# Altium PCB DC-UPS-v1.0.PcbDoc (part 8 of 8)
Units mil, origin at the board's own origin, x right, y up, seen from the top; angles counter-clockwise.
Board outline 5905.51 x 3937.01 mil, 4 copper layers (Top Layer, SIG+PWR, SIG+GND, Bottom Layer), stack 62.449 mil thick; 278 components, 138 nets, 716 pads, 780 vias.
Unrouted connection lines stored in the file: 13.
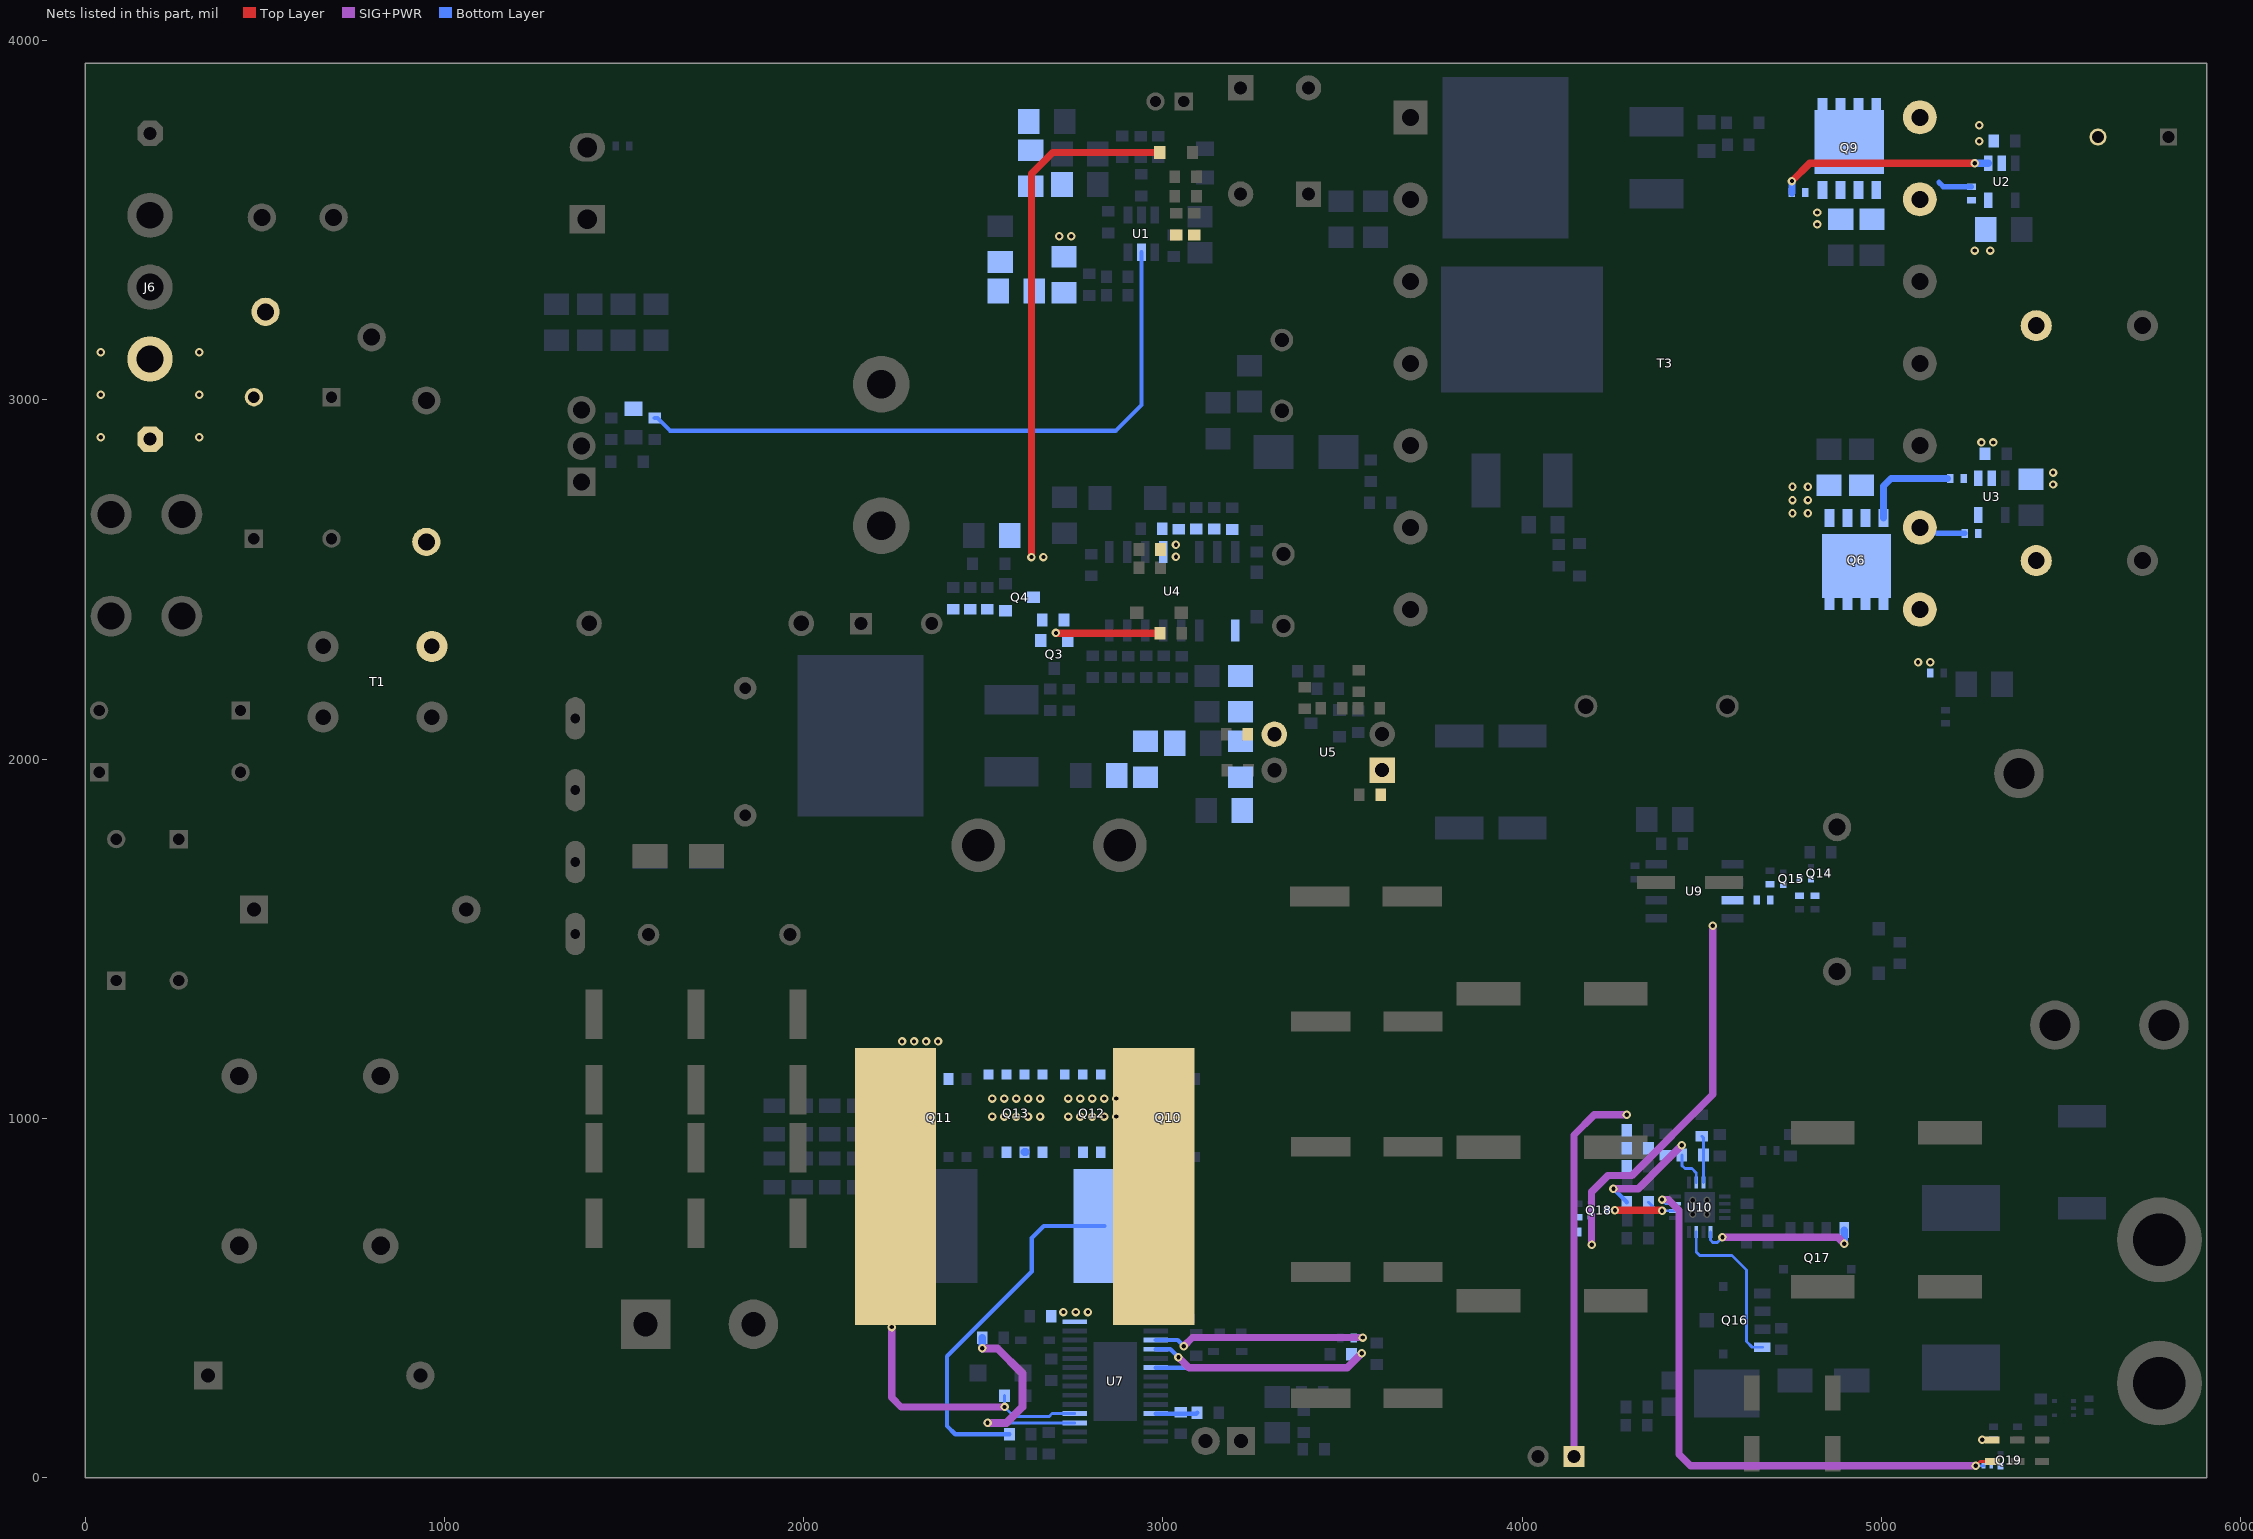
[diagram p5: the nets of this part, all layers, seen from the top]

## Via types
v1: diameter 23.62, hole 11.81, Top Layer to Bottom Layer, 767 vias
v2: diameter 19.69, hole 11.81, Top Layer to Bottom Layer, 12 vias
v3: diameter 23.62, hole 11.81, Top Layer to Bottom Layer, tented both sides, 1 vias

## Nets (pads, with @x,y where several pads share a name; then routed paths per layer and width w, separated by ;. In a path a pad name is that pad's centre, name@x,y a point inside that pad or via, vN(x,y) a via of type N, cw(c..) or ccw(c..) an arc to the next point about the centre after c; other vN are vias at no path point) (continued)
NetLED3_1: LED3.1 R97.1 | length 30.8
  Bottom Layer w8: v1@5280.18,105.28 R97.1@5311,105.28
  other v1: 5280.18,105.74
NetLED3_2: LED3.2 R96.2 U10.3 | length 1691.2
  Top Layer w8: v1(5262,33) 5274.22,45.22 LED3.2@5308,45.22
  SIG+PWR w20: v1(4389,774) 4406.28,774 4435.95,744.33 4435.95,65.05 4468,33 v1(5262,33)
  Bottom Layer w8: v1(4389,774) 4400.66,762.34 U10.3@4425.1,762.34 ; v1(5262,33) R96.2@5283.35,33
NetQ3_1: Q3.1 Q4.3 R17.1
NetQ4_1: Q4.1 R18.1 R21.2 R22.2
NetQ6_4: Q6.4 R38.1 | length 275.4
  Bottom Layer w20: Q6.4@5005,2670.84 5005,2760 5026,2781 R38.1@5182.5,2781
NetQ6_5: Q6.5 Q6.6 Q6.7 Q6.8 R35.1 T3.8 T3.9 | length 133.1
  Bottom Layer w15: T3.9@5106.32,2644.27 5122.59,2628 5123.65,2629.06 5153.8,2629.06 5154.85,2628 R35.1@5231.84,2628
NetQ9_4: Q9.4 R37.1
NetQ9_5: Q9.5 Q9.6 Q9.7 Q9.8 R34.1 T3.13 T3.14 | length 95.4
  Bottom Layer w15: 5159.67,3604.9 5171.93,3592.64 R34.1@5250,3592.64
NetQ14_1: Q14.1 Q15.3 R75.1 R76.2
NetQ15_1: Q15.1 R77.1 R78.2
NetQ16_4: Q16.4 U10.15 | length 465.9
  Bottom Layer w8: U10.15@4484.16,683.6 4484.16,627.84 4494,618 4584,618 4624,578 4624,379 4640,363 Q16.4@4668,363
NetQ17_4: Q17.4 U10.13 | length 450.1
  SIG+PWR w20: v1(4557,669) 4877.86,669 v1(4896.06,650.8)
  Bottom Layer w8: U10.13@4523.53,683.6 4523.53,661.47 4531,654 4542,654 v1(4557,669)
  Bottom Layer w20: v1(4896.06,650.8) Q17.4@4896.06,689.37
NetQ18_1: Q18.1 R87.1 R88.2
NetQ18_3: Q18.3 R83.1 U10.2 | length 242.1
  Top Layer w20: v1(4257.8,744.33) 4389,744.33 v1(4389,742.65)
  SIG+PWR w8: v1@4387.32,744.33 v1(4389,742.65)
  Bottom Layer w8: Q18.3@4235,744.33 v1(4257.8,744.33) ; R83.1@4351,766.58 4374.93,742.65 v1(4389,742.65) U10.2@4425.1,742.65
NetQ19_1: Q19.1 R96.1
NetR1_1: R1.1 R3.2
NetR2_1: R2.1 R5.1 U1.5 | length 1823.6
  Bottom Layer w12: R5.1@1586,2949 1593,2949 1628,2914 2869,2914 2940,2985 U1.5@2940,3410.68
NetR3_1: R3.1 R7.2
NetR4_1: R4.1 R8.2
NetR8_1: R8.1 R11.2
NetR11_1: R11.1 R19.2 R20.2
  other v1: 2711.67,3455 2745,3455
NetR34_2: R34.2 U2.5
NetR35_2: R35.2 U3.5
NetR37_2: R37.2 U2.1 | length 599.8
  Top Layer w20: v1(4750.5,3608.62) 4799.88,3658 v1(5259,3658)
  Bottom Layer w20: R37.2@4750.5,3576 v1(4750.5,3608.62) ; v1(5259,3658) U2.1@5297.2,3658
NetR38_2: R38.2 U3.1
NetR39_1: R39.1 R41.2
NetR41_1: R41.1 R45.2
NetR42_2: R42.2 R43.1
NetR43_2: R43.2 R44.1
NetR44_2: R44.2 U4.1
NetR53_1: R53.1 U5.1
NetR57_2: R57.2 U5.3
NetR60_1: R60.1 R67.2 U7.11 | length 116.2
  Bottom Layer w12: U7.11@2980,178.19 3092.19,178.19 R67.2@3095,181
NetR61_1: R61.1 U7.3 | length 592.9
  SIG+PWR w20: v1(3058,366) 3082,390 v1(3556,390)
  Bottom Layer w12: U7.3@2980,382.92 3041.08,382.92 v1(3058,366)
NetR69_1: R69.1 U7.17 | length 620.7
  SIG+PWR w22: v1(2497,360) 2539,360 2609,290 2609,197 2564.6,152.6 v1(2512,152.6)
  Bottom Layer w8: v1(2512,152.6) U7.17@2754.35,152.6
  Bottom Layer w22: v1(2497,360) R69.1@2497,389
NetR70_2: R70.2 U7.4 | length 610.8
  SIG+PWR w20: v1(3043,335) 3072,306 3513,306 v1(3553,346)
  Bottom Layer w12: U7.4@2980,357.33 3020.67,357.33 v1(3043,335)
NetR72_2: R72.2 U7.6 | length 454.2
  Bottom Layer w12: U7.6@2980,306.15 R72.2@3434.17,306.15
NetR77_2: R77.2 R87.2 U9.3 | length 1101.1
  SIG+PWR w20: v1(4193,648.33) 4193,795.5 4238,840.5 4304.5,840.5 4530,1066 v1(4530,1536)
  Bottom Layer w8: v1@4192.36,648.97 R87.2@4192.36,683.83
NetR82_1: R82.1 R85.2 U10.7 | length 130.2
  Bottom Layer w8: R85.2@4500,950 4503.84,946.16 U10.7@4503.84,821.39
NTRL: C1.2 C4.2 J1.1 J6.3 T1.1 VR1.2
  other v1: 44,2895.67 318,2895.67 44,3013.83 318,3013.83 44,3132 318,3132
RCS: Q12.1 Q12.2 Q12.3 Q13.1 Q13.2 Q13.3 R68.2 R73.1 | length 1023.1
  Bottom Layer w12: R73.1@2573,121 2422,121 2399,144 2399,338 2635,574 2635,667 2668.25,700.25 R68.2@2837,700.25
  Bottom Layer w22: Q13.2@2614.91,906.01 Q13.2@2618,906.01
RVCC: C17.2 C48.2 C49.2 C50.2 C51.2 D7.2 Q3.2 R17.2 R36.2 R40.1 R46.2 U4.12 | length 1739.3
  Top Layer w20: v1(2634,2562) 2634,3629 2693,3688 D7.2@2991.45,3688 ; v1(2702,2351) 2703,2350 R36.2@2991.98,2350
  other v1: 2667.33,2562 3036,2562.67 3036,2596
SGND: C26.2 C27.2 C31.2 C32.2 C33.2 C35.2 C36.2 C40.1 C41.1 C42.1 C43.1 NT2.1 Q6.1 Q6.2 Q6.3 Q9.1 Q9.2 Q9.3 U2.2 U3.2
  other v1: 5101.32,2269.22 5135.47,2269.22 4752,2683.83 4795,2683.67 4752,2720.83 4795,2720.83 4752,2758 4795,2758 5477,2764 5477,2797.33 5277.67,2881 5311,2881 5259,3415 5302,3415 4821,3487.67 4821,3521 5272,3719 5272,3763.9
SW1: C76.1 L3.1 Q10.1 Q10.2 Q10.3 Q12.5 Q12.6 Q12.7 Q12.8 U7.28
  other v1: 2723,461 2757,461 2791,461 2736.67,1005 2770,1005 2803.33,1005 2836.67,1005 2870,1005 2736.67,1055 2770,1055 2803.33,1055 2836.67,1055 2870,1055
SW2: C86.1 L3.2 Q11.1 Q11.2 Q11.3 Q13.5 Q13.6 Q13.7 Q13.8 U7.18 | length 761.5
  SIG+PWR w20: v1(2245,419) 2245,223 2271,197 v1(2559,197)
  Bottom Layer w8: C86.1@2559,228.25 v1(2559,197) 2585.42,170.58 2683.68,170.58 2691.29,178.19 U7.18@2754.35,178.19
  other v1: 2524.67,1005 2558,1005 2591.33,1005 2624.67,1005 2658,1005 2524.67,1055 2558,1055 2591.33,1055 2624.67,1055 2658,1055 2274,1214 2307.33,1214 2340.67,1214 2374,1214
TS: J4.1 R92.1 R93.1 R94.2 | length 1065.2
  SIG+PWR w20: J4.1@4144,59 4144,954 4200,1010 v1(4291,1010)
VRFEF_BQ: C99.2 R82.2 R83.2 R92.2 U10.6 | length 397.8
  SIG+PWR w20: v1(4253.58,804) 4323,804 v1(4444,925)
  Bottom Layer w8: R82.2@4444,898 4444,869 4453,860 4472,860 4484.16,847.84 U10.6@4484.16,821.39
  Bottom Layer w12: v1(4253.58,804) R83.2@4291,766.58
pads on no net: J6.2 T3.1 T3.3 T3.7 U9.5 U9.7 U10.5 U11.3

## Polygon pours and split planes (outlines as drawn)
12V# on Top Layer "12V#_L01_P024" (solid, remove dead copper, pour order 24): 4300,2100.77 5900,2100.77 5900,3923 4300,3923
BUCK-BOOST-IN on Top Layer "BUCK-BOOST-IN_L01_P045" (solid, remove dead copper, pour order 45): 4121.48,0 4121.48,990 4121.48,1466.08 5894,1466.08 5894,2060 3696.14,2060 3696.14,1827.82 3180,1827.82 3180,0
DC-GND on Top Layer "DC-GND_L01_P052" (solid, remove dead copper, pour order 52): 4225,2083 4123,2083 4123,2151.05 4123,2155.23 4123,2321 3514,2321 3514,2229.08 3357.27,2229.08 3357.27,2134.14 3198,2134.14 3198,1917 2342,1917 2342,1430 1269,1430 1269,3923 4225,3923
BAT on Top Layer "BAT_L01_P057" (solid, remove dead copper, pour order 57): 5895,1433 4152,1433 4152,0 4938,0 5895,0
LV on Top Layer "LV_L01_P004" (solid, remove dead copper, pour order 4): 10,3925 10,3422 577,3422 577,3925
GND on Top Layer "GND_L01_P001" (solid, remove dead copper, pour order 1): 4937,1031 4937,484 4686,484 4686,1073 4944,1073
GND on Top Layer "GND_L01_P054" (solid, remove dead copper, pour order 54): 2788,169 2788,159 3079.42,159 3079.42,0 3168,0 3168,541 2788,541
12V-OUT on Top Layer "12V-OUT_L01_P003" (solid, pour order 3): 2120.03,0 2124,0 3066.44,0 3066.44,347 2115,347 2115,1162 1269,1162 1269,0 2115,0
NetC4_1 on Top Layer "NETC4_1_L01_P005" (solid, remove dead copper, pour order 5): 1159,2392 733,2392 733,2242 426,2242 426,2503 1020,2503 1020,2868 614,2868 614,3924 1159,3924
EARTH on Top Layer "EARTH_L01_P006" (solid, remove dead copper, pour order 6): 762,2543.6 350,2543.6 350,1697 10,1697 10,2797 762,2797
NetC5_1 on Top Layer "NETC5_1_L01_P016" (solid, remove dead copper, pour order 16): 382,2215 736,2215 736,2054 382,2054 382,2217
NetC2_2 on Top Layer "NETC2_2_L01_P017" (solid, remove dead copper, pour order 17): 384,2042 384,1881 745,1881 745,1005 1164,1005 1164,2217 777,2217 777,2042
NetC5_1 on Top Layer "NETC5_1_L01_P019" (solid, remove dead copper, pour order 19): 378,1217.47 329,1217.47 329,1001 620,1001 620,1800 378,1800
NetC6_1 on Top Layer "NETC6_1_L01_P034" (solid, remove dead copper, pour order 34): 8,5 613,5 613,933 202,933 202,1497 8,1497
NetC44_1 on Top Layer "NETC44_1_L01_P051" (solid, remove dead copper, pour order 51): 3062,2556 3181,2556 3181,2504 3250,2504 3250,2954 3761,2954 3761,3236 2663,3236 2663,2629 3062,2629
SGND on Bottom Layer "SGND_L04_P063" (solid, remove dead copper, pour order 63): 4571,3541 4571,2990 4312,2990 4312,2047 4759.5,2047 4759.5,2648.5 4759.5,3541
GND on Bottom Layer "GND_L04_P050" (solid, remove dead copper, pour order 50): 3215.24,1373 3215.24,1774 3551,1774 3551,1376 3575,1373 5069.85,1373 5069.85,387 5900.51,387 5900.51,0 1269,0 1269,1373
NetC15_1 on Bottom Layer "NETC15_1_L04_P012" (solid, remove dead copper, pour order 12): 1265,2934 1491,2934 1491,3108 1737,3108 1737,3215.25 1265,3215.25
DC-GND on Bottom Layer "DC-GND_L04_P056" (solid, remove dead copper, pour order 56): 3679,2130 3679,2253 4134,2253 4134,2043 4252,2043 4252,3922 1268,3922 1268,1430 2075,1430 2075,2130
NetC3_2 on Bottom Layer "NETC3_2_L04_P011" (solid, remove dead copper, pour order 11): 624,1484 624,1987 930,1987 930,1245 329,1245 329,968 1161,968 1161,8 712,8 712,733 154,733 154,1484
SGND on Bottom Layer "NONET_L-01_P-001" (solid, remove dead copper, pour order 60): 4616,2047 4974,2047 4974,2157.5 5155.5,2157.5 5155.5,2330 4616,2330
12V on Bottom Layer "12V_L04_P009" (solid, remove dead copper, pour order 9): 3706,2010 5270.24,2010 5270.24,1861 5600,1861 5600,1110 4675,1110 3706,1110
BAT on Bottom Layer "BAT_L04_P007" (solid, remove dead copper, pour order 7): 5905.51,415.84 5505,415.84 5505,193.69 5410.31,193.69 5410.31,638 5632,638 5632,880 4678,880 4678,970 5052.5,970 5052.5,1089 5632,1089 5632,1863 5905.51,1863
12V# on Bottom Layer "12V#_L04_P026" (solid, remove dead copper, pour order 26): 5352,3357 5352,3580 5460,3580 5460,3929 5897,3929 5897,2125 5305,2125 5305,2730 5541,2730 5541,2945 5235,2945 5235,2814 5076,2814 4785,2814 4785,3448 5222,3448 5222,3357
LV on Bottom Layer "LV_L04_P059" (solid, remove dead copper, pour order 59): 10,3926 10,3422 577,3422 577,3926
BUCK-BOOST-IN on Bottom Layer "BUCK-BOOST-IN_L04_P002" (solid, remove dead copper, pour order 2): 4033,724 4033,253 3593.45,253 3593.45,724 2925.32,724 2925.32,1040 2924.23,1060.72 3204,1060.72 3204,1774 3692,1774 3692,1101 4039,1101 4039,724
NetC12_1 on Bottom Layer "NETC12_1_L04_P014" (solid, remove dead copper, pour order 14): 4223,3923 4223,3406 3775,3406 3775,3683.07 3310,3683.07 3310,3923
NTRL on Bottom Layer "NTRL_L04_P055" (solid, remove dead copper, pour order 55): 3,3213 3,2775.71 775,2775.71 775,2245 1165,2245 1165,2922 597,2922 597,3316 305,3316 305,3213
RCS on Bottom Layer "RCS_L04_P047" (solid, remove dead copper, pour order 47): 2550,923 2550,889 2700,889 2700,926 2751,926 2751,536 2922,536 2922,944 2548,944
NetC55_2 on Bottom Layer "NETC55_2_L04_P042" (solid, remove dead copper, pour order 42): 2786,2389 2832,2389 2862,2389 2862,2328 2825,2328 2825,2268 2786,2268
NetC30_1 on Bottom Layer "NETC30_1_L04_P039" (solid, remove dead copper, pour order 39): 2836,2321 2882,2321 2882,2466 2912,2466 2912,2309 2875,2309 2875,2268 2836,2268
NetC12_2 on Bottom Layer "NETC12_2_L04_P027" (solid, remove dead copper, pour order 27): 2212,2443 2212,2290 1908,2290 1908,1635 2679,1635 2679,1897 2388,1897 2388,2443
NetQ9_5 on Bottom Layer "NETQ9_5_L04_P025" (solid, remove dead copper, pour order 25): 5222,3469 5222,3864 4806,3864 4806,3628 5036,3628 5036,3469
NetC44_1 on Bottom Layer "NETC44_1_L04_P015" (solid, remove dead copper, pour order 15): 4541,3013 3623,3013 3623,3379 4267,3379 4267,3712 4541,3712
NetD5_2 on Bottom Layer "NETD5_2_L04_P013" (solid, remove dead copper, pour order 13): 1553,2915 1553,2855 1491,2855 1491,2674 1303,2674 1303,2810.62 1442,2810.62 1442,2915
12V# on SIG+PWR "12V#_L02_P062" (solid, remove dead copper, pour order 62): 4268,3305 3782,3305 3782,2327.76 3690.99,2236.75 3690.99,2109.01 3710,2090 5900,2090 5900,3923 4268,3923
BUCK-BOOST-IN on SIG+PWR "BUCK-BOOST-IN_L02_P041" (solid, remove dead copper, pour order 41): 5898,2071 5898,1618 4312.98,1618 4312.98,0 3208,0 3208,2071 5894,2071
NetC13_2 on SIG+PWR "NETC13_2_L02_P022" (solid, remove dead copper, pour order 22): 1273,3608 1474,3608 1474,2919 1307,2919 1307,2821 1631,2821 1631,3731 2795,3731 2795,3917 1273,3917
NetC12_1 on SIG+PWR "NETC12_1_L02_P028" (solid, remove dead copper, pour order 28): 3124.5,1623 3124.5,3431 3557,3431 3557,3641 3775,3641 3775,3379 4207,3379 4207,3923 3306,3923 3306,3815 3106,3615 2876.5,3615 2447,3615 2447,3450 2445,3450 2445,1904 2753,1904 2753,1623
NetC55_2 on SIG+PWR "NETC55_2_L02_P010" (solid, remove dead copper, pour order 10): 2770,2306 3614,2306 3614,2800 3468,2800 3468,2396 2770,2396
BAT on SIG+PWR "BAT_L02_P040" (solid, remove dead copper, pour order 40): 5640,1588 5640,1127 4891,1127 4891,9 5897,9 5897,1588
12V on SIG+PWR "12V_L02_P046" (solid, remove dead copper, pour order 46): 4854,1171 4854,0 4361,0 4361,1588 5620,1588 5620,1171
LV on SIG+PWR "LV_L02_P049" (solid, remove dead copper, pour order 49): 8,3927 8,3422 577,3422 577,3927
12V-OUT on SIG+PWR "12V-OUT_L02_P030" (solid, remove dead copper, pour order 30): 1268,10 3172,10 3172,1358 1268,1358
NTRL on SIG+PWR "NTRL_L02_P031" (solid, remove dead copper, pour order 31): 3,3213 3,2775.71 867,2775.71 867,2246 1163,2246 1163,2936 597,2936 597,3316 305,3316 305,3213
NetC5_1 on SIG+PWR "NETC5_1_L02_P032" (solid, remove dead copper, pour order 32): 592,1525 381,1525 381,1900 482,1900 482,2050 381,2050 381,2217 592,2217
NetC6_1 on SIG+PWR "NETC6_1_L02_P033" (solid, remove dead copper, pour order 33): 1413,1815 631,1815 631,1498 5,1498 5,1287 166,1287 166,1433 983,1433 983,1633 1415.41,1633
NetC8_2 on SIG+PWR "NETC8_2_L02_P035" (solid, remove dead copper, pour order 35): 2336,1431 2336,2792 1687,2792 1687,1431
NetC15_1 on SIG+PWR "NETC15_1_L02_P036" (solid, remove dead copper, pour order 36): 3095,3780 3095,3627 1790,3627 1790,3098 1647,3098 1647,3717 2945,3717 2945,3780
SGND on SIG+GND "SGND_L03_P029" (solid, remove dead copper, pour order 29): 5905.51,3931 5905.51,2218 4314,2218 4314,3931 5676,3931
GND on SIG+GND "GND_L03_P044" (solid, remove dead copper, pour order 44): 4305,1815 3317,1815 3317,1364 1270,1364 1270,0 5900.51,0 5900.51,2148 4305,2148
DC-GND on SIG+GND "DC-GND_L03_P037" (solid, remove dead copper, pour order 37): 3249,1430 3249,1929 4216,1929 4216,3923 1269,3923 1269,1430
EARTH on SIG+GND "EARTH_L03_P048" (solid, remove dead copper, pour order 48): 762,2543.6 350,2543.6 350,1697 10,1697 10,2797 762,2797
NetC6_1 on SIG+GND "NETC6_1_L03_P061" (solid, remove dead copper, pour order 61): 8,5 613,5 613,933 202,933 202,1497 8,1497
RVCC on SIG+GND "RVCC_L03_P023" (solid, remove dead copper, pour order 23): 2744,2542 3052,2542 3052,2630 2606,2630 2606,2342 2744,2342

## Other copper
Top Layer:
  rectangle net 12V: 4288,1854 4382,1915
  rectangle net 12V: 5397.8,1128 5601.4,1191.57
  rectangle net 12V: 3701,1692 4135,1767
  rectangle net GND: 4530,10 4967.46,120
  rectangle net GND: 5650,10.2 5893,400.95
  rectangle net NetC94_1: 4461,297 4674,317
  rectangle net NetC94_1: 4461,161 4888,301
  rectangle net GND: 4161,1280 4360,1410
  rectangle net GND: 4161,856 4360,986
  rectangle net GND: 4161,432 4360,562
  rectangle net GND: 3349.75,1552 3523.75,1682
  rectangle net GND: 3352,1203.67 3526,1333.67
  rectangle net GND: 3352,855.33 3526,985.33
  rectangle net GND: 3352,507 3526,637
  region net GND: 3559.02,153.33 3559.02,293.33 3355.97,293.33 3355.97,153.33
  rectangle net GND: 1355,638.87 1482,776.66
  rectangle net GND: 1638.5,638.87 1765.5,776.66
  rectangle net GND: 1922,638.87 2049,776.66
  rectangle net GND: 1269,1213 2115,1367
  rectangle net NetC37_1: 5165.5,2138 5265,2281
  rectangle net NetC93_1: 4448,1635 4619.15,1679
  rectangle net NetC20_1: 3030,3800 3146,3860
  rectangle net NetD2_1: 1680,1696.79 1806.2,1763.72
  rectangle net GND: 4253.03,1635 4430.03,1679
  rectangle net BUCK-BOOST-IN: 3117,322 3217,458
  rectangle net DC-GND: 3050,2104 3198,2164
  rectangle net DC-GND: 3162,1949 3198,2164
  rectangle net NetC34_2: 2853,2510 2950,2602
  rectangle net RVCC: 2978,2560 3046,2610
  rectangle net NetD11_2: 3030,2329 3101,2439
  rectangle net NetR53_1: 3574,1877 3671,2005
  rectangle net NetC58_2: 3215,1917 3354,2012.5
  rectangle net NetR57_2: 3215,2026 3356,2127
  rectangle net NetC52_2: 3483,2121 3518,2220
  rectangle net NetC52_2: 3371,2185 3518,2220
  rectangle net NetC52_1: 3371,2119 3472,2164
  rectangle net NetC52_2: 3483,1877 3562.5,2202
  rectangle net NetC57_1: 3574,2028 3671,2173
  rectangle net NetR11_1: 2685,3441 3105,3474
  rectangle net NetC23_2: 2789,3484 3050,3640
  rectangle net NetC23_2: 2789,3484 3107,3534
  rectangle net NetC20_1: 3057,3660 3146,3860
  rectangle net SW2: 2142.56,389 2385,1239
  rectangle net SW1: 2710,390 3100,1240
  region net NetLED2_2: 5417.32,58.94 5355.32,58.94 5355.32,32.94 5417.32,32.94
  rectangle net NetLED1_1: 5406.64,92 5468.64,118
  rectangle net NetLED2_1: 5337.32,92 5399.32,118
  rectangle net NetLED3_1: 5268,92 5330,118
  rectangle net 12V#: 3698.5,2102 4115,2309
  rectangle net 12V#: 3527.5,2225 4114,2309
  rectangle net NetC12_1: 1274.86,3408 2591,3594
  pour cut-out: 5390,1256.22 ccw(c5483.78,1264.9) 5556.23,1204.72 ccw(c5482.1,1259.46)
  pour cut-out: 4813.4,1407.84 ccw(c4876.43,1407.84) 4876.43,1344.81 ccw(c4876.43,1407.84) 4939.46,1407.84 ccw(c4876.43,1407.84) 4876.43,1470.88 ccw(c4876.43,1407.84)
  pour cut-out: 4813.4,1809.43 ccw(c4876.43,1809.43) 4876.43,1746.4 ccw(c4876.43,1809.43) 4939.46,1809.43 ccw(c4876.43,1809.43) 4876.43,1872.46 ccw(c4876.43,1809.43)
  pour cut-out: 4240,1700 4240,1620 4630,1620 4630,1700 4245.9,1700
  pour cut-out: 1681,1619 1840,1619 1840,1830 1681,1830 1681,1667.86
  pour cut-out: 1282,2046 1282,1619 1681,1619 1681,2046
SIG+PWR:
  rectangle net NetC13_2: 1307,2831 1441,2919
  rectangle net SW1: 2720.33,955 2910.33,1075
  rectangle net SW2: 2500,955 2690,1075
  rectangle net 12V-OUT: 2390,900 2475,1065
  pour cut-out: 2906.86,2459.38 2941.86,2459.38 2941.86,2432.26 2906.86,2432.26
Bottom Layer:
  rectangle net NetC98_1: 4645.55,399.22 5063,544.01
  rectangle net NetR11_1: 2686,3367 2763,3473
  rectangle net NetC38_1: 2364.19,2462 2433.5,2495.11
  region net NetR77_2: 4514.22,1621.96 4514.22,1518 4544.22,1518 4544.22,1621.96
  rectangle net NetC37_1: 5165,2127 5265,2330
  rectangle net SGND: 5084,2226.5 5145.19,2281
  rectangle net NetQ6_5: 4793,2350 5200,2625.97
  rectangle net SGND: 5084,2226.5 5145.19,2281
  region net NetD2_1: 1880,1784 1802,1784 1802,1402 1880,1402
  region net NetD2_1: 3151,1402 3151,1471 1821,1471 1821,1402
  rectangle net NetD2_1: 3073,1425 3151,1896
  region net NetD2_1: 1880,1672 1880,1783.99 1680.53,1783.99 1680.53,1672
  rectangle net NetC3_2: 1502,1672 1629,1904
  region net SGND: 5499,2885.72 5499,2923.88 5257.03,2923.88 5257.03,2885.72
  rectangle net 12V#: 3690,2032.46 4112.95,2226
  rectangle net NetC98_1: 4706.99,506.98 4919.01,627.06
  rectangle net GND: 4669,637.5 4723.43,697.5
  rectangle net GND: 4669,664.22 4855,746
  rectangle net NetC94_1: 4621,154 4883,195
  rectangle net 12V: 5166,99 5228,151.28
  rectangle net 12V: 4334,171.54 4398.54,214.25
  rectangle net 12V: 4387.9,109 4439.08,295.95
  rectangle net 12V: 5166,128 5390.5,151.28
  rectangle net GND: 2198.22,756.5 2263.83,860.86
  rectangle net GND: 4990,2090 5150.19,2146.78
  rectangle net BAT: 4698.5,878.5 4838,923.5
  rectangle net 12V#: 3690,2032.46 4110.2,2105
  rectangle net NetC98_2: 4702.99,237.32 4808.21,376.78
  rectangle net NetC103_2: 5079,670 5344,818
  rectangle net GND: 4416.7,1746.5 4520,1865
  rectangle net GND: 4490,1687.91 4827.14,1757.5
  rectangle net NetC20_1: 3032.41,3792.35 3147,3861
  rectangle net 12V: 4145,1692 4376.7,1875
  rectangle net GND: 4673,1672.82 4735.22,1722.5
  rectangle net GND: 4990,2051 5365,2105
  rectangle net NetC30_1: 3460.76,3383 3530.76,3482.25
  rectangle net NetC55_2: 3512,2694 3596,2790
  rectangle net NetR34_2: 5285.39,3527 5309.01,3577.29
  region net NetR34_2: 5309.01,3527 5309.01,3564.64 5237.5,3564.64 5237.5,3527
  rectangle net NetQ9_5: 5084.23,3713.38 5128.42,3852
  rectangle net NetQ9_5: 5084.23,3486 5128.42,3634
  rectangle net SGND: 5241,3384.55 5325,3508.36
  rectangle net SGND: 5250,3702.5 5349,3786
  rectangle net NetC12_2: 2357,1722 2621,1800.17
  rectangle net NetC12_2: 2212,2290 2388,2443
  rectangle net NetD2_1: 1680.53,1693.79 1805.5,1760.72
  rectangle net NetC3_2: 758,1836 1629,1987
  rectangle net NetC98_1: 5017,243.02 5383,435
  rectangle net GND: 3450,295 3480,360
  rectangle net 12V: 4387.9,99 5196.9,145.75
  rectangle net 12V: 4753,1550 4785,1591
  rectangle net TS: 4274,850 4311,1025
  rectangle net VRFEF_BQ: 4335,895 4423,935
  rectangle net VRFEF_BQ: 4382,880 4457,935
  rectangle net NetC106_1: 4336,798 4371,887
  region net NetC78_1: 3414,143 3365,143 3365,51 3414,51
  rectangle net NetC78_2: 3365,169 3414,261
  rectangle net NetR70_2: 3510,325 3567,365
  rectangle net NetR61_1: 3522,376 3568,410
  rectangle net BUCK-BOOST-IN: 3071,428 3176,463
  rectangle net BUCK-BOOST-IN: 3120,323 3176,373
  rectangle net 12V-OUT: 3030,50 3070,142
  rectangle net NetD14_2: 3199,341 3242,421
  rectangle net NetC74_2: 3072,380 3175,419
  rectangle net NetJ5_1: 3031,429 3055,500
  rectangle net NetJ5_1: 2945,429 3055,458
  rectangle net HDRV1: 3075,1088 3134,1131
  rectangle net NetD9_1: 4074,2464 4189,2563
  rectangle net DC-GND: 3837,2705 4040,2871
  rectangle net NetC56_2: 3100,1965 3166,2084
  rectangle net DC-GND: 2490,1922 2721,2009
  rectangle net DC-GND: 2667,1922 2721,2158
  rectangle net DC-GND: 2667,2106 3158,2158
  rectangle net DC-GND: 2776,2106 3073,2248
  rectangle net DC-GND: 2540,2461 2606,2563
  rectangle net DC-GND: 2493,2461 2606,2516
  rectangle net DC-GND: 1265,3234 1656,3369
  region net NetC29_1: 3658,3482.25 3556,3482.25 3556,3418.25 3658,3418.25
  rectangle net DC-GND: 3191,3056 3368,3209
  rectangle net NetC103_2: 5079,670 5622.93,820
  rectangle net NetC44_1: 2684,2591 2770,2676
  rectangle net DC-GND: 2780,2477 2964,2528
  rectangle net NetC7_2: 1282,2020 1889,2440
  rectangle net NetC56_2: 2984.8,2271 3070.8,2302
  rectangle net NetC56_2: 3033.8,2271 3070.8,2390
  rectangle net NetC29_1: 2935,2270 2972,2466
  rectangle net NetC29_1: 2886,2270 2972,2301
  rectangle net NetC45_1: 3086,2413 3366,2451
  rectangle net NetC45_1: 3237,2338 3366,2451
  rectangle net NetC45_1: 3086,2200 3164,2448
  rectangle net NetR44_2: 3178,2200 3228,2389
  rectangle net RVCC: 2617,2510 2756,2581
  rectangle net RVCC: 2690,2310 2756,2581
  rectangle net RVCC: 2539,2577 2673,2663
  rectangle net NetC17_1: 2442,2525 2517,2663
  rectangle net NetC17_1: 2442,2461 2485,2663
  rectangle net NetQ4_1: 2398,2394 2584,2433
  rectangle net NetC37_1: 3356,2074 3391,2296
  rectangle net NetC37_1: 3356,2074 3430.74,2118
  rectangle net NetC57_2: 3474,2171 3568,2220
  rectangle net NetC57_2: 3524,2117 3568,2220
  rectangle net NetC52_1: 3407,2135 3464,2266
  rectangle net NetC52_1: 3444,2119 3509.48,2161
  rectangle net NetC57_1: 3462,2026 3666,2105
  rectangle net NetR42_2: 3176,1819 3259,1983
  rectangle net NetR43_2: 3179,2017 3259,2162
  rectangle net NetR41_1: 2909,2006 3065,2095
  rectangle net NetR39_1: 2840,1904 2992,1998
  rectangle net NetC12_1: 2737,1635 3029,1846
  rectangle net NetC12_1: 2737,1670 2810,1997
  rectangle net NetC14_2: 2501,2118 2656,2278
  rectangle net NetC14_2: 2501,2178 2762,2278
  rectangle net NetQ3_1: 2621,2310 2681,2470
  rectangle net NetR3_1: 2593,3561 2765,3638
  rectangle net NetR1_1: 2597,3665 2670,3810
  rectangle net NetC13_2: 2686,3650 2765,3860
  rectangle net NetC44_2: 2663,2686 2871,2816
  rectangle net DC-GND: 3238,2619 3284,2720
  rectangle net DC-GND: 3071,2672 3284,2720
  rectangle net NetD12_2: 2946,2673 3064,2774.72
  rectangle net DC-GND: 2922,2488 2964,2659
  rectangle net NetC34_2: 2782.5,2545.99 2882,2607.02
  rectangle net RVCC: 2980,2546 3048,2647
  rectangle net RVCC: 2980,2621 3215,2662
  rectangle net NetC38_1: 3231,2475 3293,2595
  rectangle net DC-GND: 3615,2586 4040,2744
  rectangle net NetD10_1: 3421,2798 3752,2919
  rectangle net NetD10_2: 3112,2807.76 3371,2921
  rectangle net NetC38_1: 3113,2936 3373,3030
  rectangle net NetC21_2: 3086,3481 3141,3640
  rectangle net DC-GND: 2773,3242 2859,3310
  rectangle net DC-GND: 2964,3318 3138,3436
  rectangle net DC-GND: 2822,3406 2880,3482
  rectangle net NetC23_2: 2791,3489.81 2914.8,3539.25
  rectangle net NetC21_2: 2965.2,3481 3141,3548
  rectangle net NetC22_2: 2922.5,3485 2957.5,3582.25
  rectangle net NetC20_1: 3056,3678 3147,3861
  rectangle net NetC13_1: 2787,3564 2850,3722
  rectangle net NetC13_1: 2787,3606 3010,3695
  rectangle net NetC15_1: 2869.5,3712.36 3038.2,3770.5
  region net SGND: 5349,3634 5349,3786 5318,3786 5318,3634
  rectangle net SGND: 4630,3469 5015,3541
  rectangle net SGND: 4868,3469 5015,3610
  rectangle net SGND: 5380,2747 5499,2919.86
  rectangle net SGND: 4736,2645.84 4980,2792
  rectangle net NetQ6_5: 5055,2350 5240.84,2705
  rectangle net NetR35_2: 5257.03,2615.5 5280.65,2700.72
  rectangle net NetR38_2: 5215,2755 5280.65,2805
  rectangle net SGND: 5257.03,2830 5323.95,2919.86
  rectangle net SGND: 5290,2755 5323.95,2894.87
  rectangle net NetC42_2: 5331.83,2755 5370,2870
  rectangle net 12V: 4295,1692 4376.7,1875
  rectangle net 12V: 4295,1692 4405,1785
  rectangle net NetC93_1: 4295,1592 4330,1674.5
  rectangle net NetC93_1: 4440,1592 4506,1672
  rectangle net NetC93_1: 4300,1592 4450.4,1622
  rectangle net NetC93_1: 4440,1642 4620,1672
  rectangle net NetR77_2: 4514.95,1592 4663,1622
  rectangle net NetQ15_1: 4672,1592 4737,1663
  rectangle net NetQ14_1: 4758,1608 4828,1677
  rectangle net NetD17_1: 4835,1506 5016,1854
  rectangle net NetD15_1: 2541,269 2558,407
  rectangle net NetD15_1: 2439,266 2557,322
  rectangle net NetD15_1: 2541,371 2621,407
  rectangle net NetC86_2: 2581,211 2634,320
  rectangle net NetC88_2: 2619,48 2701,87
  rectangle net NetC88_1: 2618,102 2700,141
  rectangle net 12V-OUT: 2676,324 2789,339
  rectangle net 12V-OUT: 2648,315 2709,345
  rectangle net SW1: 2674,426 2803,473
  rectangle net CSG: 2287.5,540 2487,861
  rectangle net 12V-OUT: 1809,868 2467,1001.11
  rectangle net HDRV2: 2430,1090 2470,1160
  rectangle net SW2: 2260,1090 2420,1230
  rectangle net SW2: 2260,1170 2690,1240
  rectangle net SW2: 2500,954.66 2690,1240
  rectangle net SW1: 2710,1090 3060,1240
  rectangle net SW1: 2710,954.66 2891.57,1140
  rectangle net NetC96_1: 4270,124 4306,223
  rectangle net BAT: 5424.31,202.19 5494.31,265.19
  rectangle net NetC108_2: 5522.31,206.19 5618.31,236.19
  rectangle net NetQ19_1: 5297,16 5343,46
  rectangle net NetLED2_2: 5364,33 5418,64
  rectangle net NetC94_1: 4458,154 4659.55,328
  rectangle net NetC94_1: 4419,320 4608.6,546.77
  rectangle net NetD9_2: 4054,2581 4189,2871
  rectangle net NetQ9_4: 4778,3549 4848.84,3608.62
  region net NetC40_2: 5393,3632 5393,3745 5357,3745 5357,3632
  rectangle net NetD8_1: 4615,3576 4704,3821
  rectangle net NetD8_2: 4555,3682 4601,3821
  rectangle net NetD8_2: 4267,3727 4590,3821
  rectangle net NetC25_1: 3181.71,3505 3754.61,3672.61
  rectangle net NetC12_1: 2457,3453 2589,3552
  rectangle net INDUC: 1503,3638 2335,3743
  rectangle net INDUC: 1848,2946 2335,3743
  rectangle net NetC18_1: 2776,3323 2859,3376
  rectangle net NetC18_2: 2888,3272 2919,3439
  region net NetR8_1: 2764.25,3260.25 2764.25,3340.25 2606.25,3340.25 2606.25,3260.25
  rectangle net NetR4_1: 2505,3260.25 2585,3418.25
  rectangle net NetR2_1: 1500,2934 1608,3000
  rectangle net NetD5_1: 1532,2809 1581,2845
  rectangle net NetD5_1: 1567,2809 1608,2906
  rectangle net NetC13_2: 1274,3662 1487,3814
  rectangle net NetQ18_1: 4140,666.33 4169,740.33
  rectangle net NetQ18_1: 4140,716.33 4200,740.33
  rectangle net NetC97_2: 4336,646 4367,734
  rectangle net NetC104_1: 4531,853 4678,911
  pour cut-out: 4524,2197 4618,2197 4618,2099 4524,2099
  pour cut-out: 2551,107.75 2551,79.25 2399.22,79.25 2399.22,107.75
  pour cut-out: 3103.76,1060.72 3103.76,1088 3141.14,1088 3141.14,1040 3103.76,1040
  pour cut-out: 4627.14,1670.41 4664.71,1670.41 4664.96,1629 4644.91,1629 4627.14,1629
  pour cut-out: 4758,1670 4737,1670 4737,1629 4737,1608 4758,1608
  pour cut-out: 4337.14,1692 4337.14,1629.14 4439.73,1629.14 4440.26,1692
  pour cut-out: 2075,1430 1750.52,1430 1750.52,1622.52 2075,1622.52
  pour cut-out: 1275,2020 1901.41,2020 1901.41,1623 1275,1623

## Silkscreen, mask and mechanical layers (free items; w line width, h text height)
Top Overlay:
  lines w7: 1165,44.25 1265,44.25 1265,3914.25 1165,3914.25 1165,44.25
  text "LV" at 231.22,3707.94 h100
  text "NTRL" at 70.37,2777.94 h100
  text "EARTH" at 22.58,2272.94 h100
  text "BATT" at 5641.92,552.98 h100 r90
  text "GND" at 5649.21,146.5 h100 r90
  text "CHRG" at 5328.19,126.82 h60 r90
  text "FULL" at 5401.57,121.82 h60 r90
  text "LOW" at 5471.89,121.82 h60 r90
  text "DC-UPS - v1.0" at 66.42,12.25 h60 r90
  text "12V-OUT" at 1384.67,5.37 h100 r90
  text "GND" at 2114.21,5.37 h100 r90
Bottom Overlay:
  drawing of 37 lines, arcs and shapes, not listed
  text "ZERO CARBON FOOTPRINT" at 2444.71,3438.52 h40
  text "#" at 4217,649.64 h60
  text "#" at 4070.47,144.39 h60
Top Solder:
  rectangle: 3696,1471 5885,2059
  region: 4097,135 4097,1855 3180,1855 3180,135
Bottom Solder:
  region: 4097,144 4097,1855 3180,1855 3180,144
  rectangle: 3696,1471 5885,2059
  region: 2277.61,1064.86 2277.61,866.73 2473.61,866.73 2473.61,1064.86
  region: 2913.81,1064.38 2913.81,866.25 3109.81,866.25 3109.81,1064.38
  region: 3059.9,1078.99 3059.9,1131.99 2914.9,1131.99 2914.9,1078.99
  region: 2423.9,1078.99 2423.9,1131.99 2278.9,1131.99 2278.9,1078.99
  region: 2686,877 2686,930 2541,930 2541,877
  region: 2690,951 2690,1158 2494,1158 2494,951
  region: 2902,951 2902,1158 2706,1158 2706,951
  region: 2898,877 2898,930 2753,930 2753,877
Board_Outline:
  the board outline again, w10
Fabrication:
  drawing of 295 lines, arcs and shapes, not listed
  text "Layer" at 6473.09,1037 h60
  text "Name" at 6883,1037 h60
  text "Material" at 7812.74,1037 h60
  text "Thickness" at 8672.51,1037 h60
  text "Constant" at 9322.35,1037 h60
  text "Board Layer Stack" at 9892.21,1037 h60
  text "Top Overlay" at 6883,917 h60
  text "Top Solder" at 6883,797 h60
  text "Solder Resist" at 7812.74,797 h60
  text "0.40mil" at 8672.51,797 h60
  text "3.5" at 9322.35,797 h60
  text "1" at 6473.09,677 h60
  text "Top Layer" at 6883,677 h60
  text "1.38mil" at 8672.51,677 h60
  text "Dielectric 2" at 6883,557 h60
  text "PP-006" at 7812.74,557 h60
  text "8.28mil" at 8672.51,557 h60
  text "4.1" at 9322.35,557 h60
  text "2" at 6473.09,437 h60
  text "SIG+PWR" at 6883,437 h60
  text "CF-004" at 7812.74,437 h60
  text "0.60mil" at 8672.51,437 h60
  text "Dielectric 1" at 6883,317 h60
  text "FR-4" at 7812.74,317 h60
  text "41.93mil" at 8672.51,317 h60
  text "4.8" at 9322.35,317 h60
  text "3" at 6473.09,197 h60
  text "SIG+GND" at 6883,197 h60
  text "CF-004" at 7812.74,197 h60
  text "0.60mil" at 8672.51,197 h60
  text "Dielectric 3" at 6883,77 h60
  text "PP-006" at 7812.74,77 h60
  text "8.28mil" at 8672.51,77 h60
  text "4.1" at 9322.35,77 h60
  text "4" at 6473.09,-43 h60
  text "Bottom Layer" at 6883,-43 h60
  text "1.38mil" at 8672.51,-43 h60
  text "Bottom Solder" at 6883,-163 h60
  text "Solder Resist" at 7812.74,-163 h60
  text "0.40mil" at 8672.51,-163 h60
  text "3.5" at 9322.35,-163 h60
  text "Bottom Overlay" at 6883,-283 h60
  text "Total board thickness:" at 6473.09,-403 h60
  text "63.25mil" at 8672.51,-403 h60
Drill Drawing:
  drawing of 188 lines, arcs and shapes, not listed
  text "Symbol" at 6504.12,5380 h72
  text "Count" at 7010,5380 h72
  text "Hole Size" at 7609.84,5380 h72
  text "Plated" at 8759.5,5380 h72
  text "Hole Type" at 9265.38,5380 h72
  text "Drill Layer Pair" at 9999.18,5380 h72
  text "Via/Pad" at 11498.73,5380 h72
  text "Pad Shape" at 12088.58,5380 h72
  text "Template" at 12834.38,5380 h72
  text "Hole Length" at 15163.66,5380 h72
  text "Routed Path Length" at 16263.34,5380 h72
  text "772" at 7010,5230 h60
  text "11.81mil (0.300mm)" at 7609.84,5230 h60
  text "PTH" at 8759.5,5230 h60
  text "Round" at 9265.38,5230 h60
  text "Top Layer - Bottom Layer" at 9999.18,5230 h60
  text "(Mixed)" at 11498.73,5230 h60
  text "Rounded" at 12088.58,5230 h60
  text "(Mixed)" at 12834.38,5230 h60
  text "-" at 15163.66,5230 h60
  text "-" at 16263.34,5230 h60
  text "E" at 6475.03,5220.01 h66.67
  text "12" at 7010,5080 h60
  text "11.81mil (0.300mm)" at 7609.84,5080 h60
  text "PTH" at 8759.5,5080 h60
  text "Round" at 9265.38,5080 h60
  text "Top Layer - Bottom Layer" at 9999.18,5080 h60
  text "Via" at 11498.73,5080 h60
  text "Rounded" at 12088.58,5080 h60
  text "v50h30m60" at 12834.38,5080 h60
  text "-" at 15163.66,5080 h60
  text "-" at 16263.34,5080 h60
  text "F" at 6475.03,5070.01 h66.67
  text "4" at 7010,4930 h60
  text "27.56mil (0.700mm)" at 7609.84,4930 h60
  text "PTH" at 8759.5,4930 h60
  text "Slot" at 9265.38,4930 h60
  text "Top Layer - Bottom Layer" at 9999.18,4930 h60
  text "Pad" at 11498.73,4930 h60
  text "Rounded" at 12088.58,4930 h60
  text "r300_140h70_220r100m305_145mx305_145p0" at 12834.38,4930 h60
  text "86.62mil (2.200mm)" at 15163.66,4930 h60
  text "59.06mil (1.500mm)" at 16263.34,4930 h60
  text "14" at 7010,4780 h60
  text "31.50mil (0.800mm)" at 7609.84,4780 h60
  text "PTH" at 8759.5,4780 h60
  text "Round" at 9265.38,4780 h60
  text "Top Layer - Bottom Layer" at 9999.18,4780 h60
  text "Pad" at 11498.73,4780 h60
  text "(Mixed)" at 12088.58,4780 h60
  text "(Mixed)" at 12834.38,4780 h60
  text "-" at 15163.66,4780 h60
  text "-" at 16263.34,4780 h60
  text "2" at 7010,4630 h60
  text "32.28mil (0.820mm)" at 7609.84,4630 h60
  text "PTH" at 8759.5,4630 h60
  text "Round" at 9265.38,4630 h60
  text "Top Layer - Bottom Layer" at 9999.18,4630 h60
  text "Pad" at 11498.73,4630 h60
  text "Rounded" at 12088.58,4630 h60
  text "c160h82" at 12834.38,4630 h60
  text "-" at 15163.66,4630 h60
  text "-" at 16263.34,4630 h60
  text "D" at 6475.03,4620.01 h66.67
  text "2" at 7010,4480 h60
  text "33.47mil (0.850mm)" at 7609.84,4480 h60
  text "PTH" at 8759.5,4480 h60
  text "Round" at 9265.38,4480 h60
  text "Top Layer - Bottom Layer" at 9999.18,4480 h60
  text "Pad" at 11498.73,4480 h60
  text "(Mixed)" at 12088.58,4480 h60
  text "(Mixed)" at 12834.38,4480 h60
  text "-" at 15163.66,4480 h60
  text "-" at 16263.34,4480 h60
  text "B" at 6475.03,4470.01 h66.67
  text "2" at 7010,4330 h60
  text "35.43mil (0.900mm)" at 7609.84,4330 h60
  text "PTH" at 8759.5,4330 h60
  text "Round" at 9265.38,4330 h60
  text "Top Layer - Bottom Layer" at 9999.18,4330 h60
  text "Pad" at 11498.73,4330 h60
  text "(Mixed)" at 12088.58,4330 h60
  text "(Mixed)" at 12834.38,4330 h60
  text "-" at 15163.66,4330 h60
  text "-" at 16263.34,4330 h60
  text "A" at 6475.03,4320.01 h66.67
  text "2" at 7010,4180 h60
  text "35.43mil (0.900mm)" at 7609.84,4180 h60
  text "PTH" at 8759.5,4180 h60
  text "Round" at 9265.38,4180 h60
  text "Top Layer - Bottom Layer" at 9999.18,4180 h60
  text "Pad" at 11498.73,4180 h60
  text "(Mixed)" at 12088.58,4180 h60
  text "(Mixed)" at 12834.38,4180 h60
  text "-" at 15163.66,4180 h60
  text "-" at 16263.34,4180 h60
  text "6" at 7010,4030 h60
  text "36.00mil (0.914mm)" at 7609.84,4030 h60
  text "PTH" at 8759.5,4030 h60
  text "Round" at 9265.38,4030 h60
  text "Top Layer - Bottom Layer" at 9999.18,4030 h60
  text "Pad" at 11498.73,4030 h60
  text "(Mixed)" at 12088.58,4030 h60
  text "(Mixed)" at 12834.38,4030 h60
  text "-" at 15163.66,4030 h60
  text "-" at 16263.34,4030 h60
  text "2" at 7010,3880 h60
  text "36.22mil (0.920mm)" at 7609.84,3880 h60
  text "PTH" at 8759.5,3880 h60
  text "Round" at 9265.38,3880 h60
  text "Top Layer - Bottom Layer" at 9999.18,3880 h60
  text "Pad" at 11498.73,3880 h60
  text "Octagonal" at 12088.58,3880 h60
  text "s180h92c50" at 12834.38,3880 h60
  text "-" at 15163.66,3880 h60
  text "-" at 16263.34,3880 h60
  text "14" at 7010,3730 h60
  text "39.37mil (1.000mm)" at 7609.84,3730 h60
  text "PTH" at 8759.5,3730 h60
  text "Round" at 9265.38,3730 h60
  text "Top Layer - Bottom Layer" at 9999.18,3730 h60
  text "Pad" at 11498.73,3730 h60
  text "(Mixed)" at 12088.58,3730 h60
  text "(Mixed)" at 12834.38,3730 h60
  text "-" at 15163.66,3730 h60
  text "-" at 16263.34,3730 h60
  text "2" at 7010,3580 h60
  text "43.00mil (1.092mm)" at 7609.84,3580 h60
  text "PTH" at 8759.5,3580 h60
  text "Round" at 9265.38,3580 h60
  text "Top Layer - Bottom Layer" at 9999.18,3580 h60
  text "Pad" at 11498.73,3580 h60
  text "Rounded" at 12088.58,3580 h60
  text "c180h109m180p0" at 12834.38,3580 h60
  text "-" at 15163.66,3580 h60
  text "-" at 16263.34,3580 h60
  text "4" at 7010,3430 h60
  text "43.31mil (1.100mm)" at 7609.84,3430 h60
  text "PTH" at 8759.5,3430 h60
  text "Round" at 9265.38,3430 h60
  text "Top Layer - Bottom Layer" at 9999.18,3430 h60
  text "Pad" at 11498.73,3430 h60
  text "Rounded" at 12088.58,3430 h60
  text "c220h110" at 12834.38,3430 h60
  text "-" at 15163.66,3430 h60
  text "-" at 16263.34,3430 h60
  text "2" at 7010,3280 h60
  text "43.31mil (1.100mm)" at 7609.84,3280 h60
  text "PTH" at 8759.5,3280 h60
  text "Round" at 9265.38,3280 h60
  text "Top Layer - Bottom Layer" at 9999.18,3280 h60
  text "Pad" at 11498.73,3280 h60
  text "Rounded" at 12088.58,3280 h60
  text "(Mixed)" at 12834.38,3280 h60
  text "-" at 15163.66,3280 h60
  text "-" at 16263.34,3280 h60
  text "C" at 6475.03,3270.01 h66.67
  text "2" at 7010,3130 h60
  text "47.24mil (1.200mm)" at 7609.84,3130 h60
  text "PTH" at 8759.5,3130 h60
  text "Round" at 9265.38,3130 h60
  text "Top Layer - Bottom Layer" at 9999.18,3130 h60
  text "Pad" at 11498.73,3130 h60
  text "Rounded" at 12088.58,3130 h60
  text "(Mixed)" at 12834.38,3130 h60
  text "-" at 15163.66,3130 h60
  text "-" at 16263.34,3130 h60
  text "27" at 7010,2980 h60
  text "47.24mil (1.200mm)" at 7609.84,2980 h60
  text "PTH" at 8759.5,2980 h60
  text "Round" at 9265.38,2980 h60
  text "Top Layer - Bottom Layer" at 9999.18,2980 h60
  text "Pad" at 11498.73,2980 h60
  text "(Mixed)" at 12088.58,2980 h60
  text "(Mixed)" at 12834.38,2980 h60
  text "-" at 15163.66,2980 h60
  text "-" at 16263.34,2980 h60
  text "4" at 7010,2830 h60
  text "51.18mil (1.300mm)" at 7609.84,2830 h60
  text "PTH" at 8759.5,2830 h60
  text "Round" at 9265.38,2830 h60
  text "Top Layer - Bottom Layer" at 9999.18,2830 h60
  text "Pad" at 11498.73,2830 h60
  text "Rounded" at 12088.58,2830 h60
  text "c250h130" at 12834.38,2830 h60
  text "-" at 15163.66,2830 h60
  text "-" at 16263.34,2830 h60
  text "2" at 7010,2680 h60
  text "55.12mil (1.400mm)" at 7609.84,2680 h60
  text "PTH" at 8759.5,2680 h60
  text "Round" at 9265.38,2680 h60
  text "Top Layer - Bottom Layer" at 9999.18,2680 h60
  text "Pad" at 11498.73,2680 h60
  text "(Mixed)" at 12088.58,2680 h60
  text "(Mixed)" at 12834.38,2680 h60
  text "-" at 15163.66,2680 h60
  text "-" at 16263.34,2680 h60
  text "2" at 7010,2530 h60
  text "66.93mil (1.700mm)" at 7609.84,2530 h60
  text "PTH" at 8759.5,2530 h60
  text "Round" at 9265.38,2530 h60
  text "Top Layer - Bottom Layer" at 9999.18,2530 h60
  text "Pad" at 11498.73,2530 h60
  text "(Mixed)" at 12088.58,2530 h60
  text "(Mixed)" at 12834.38,2530 h60
  text "-" at 15163.66,2530 h60
  text "-" at 16263.34,2530 h60
  text "J" at 6475.03,2520.01 h66.67
  text "7" at 7010,2380 h60
  text "74.80mil (1.900mm)" at 7609.84,2380 h60
  text "PTH" at 8759.5,2380 h60
  text "Round" at 9265.38,2380 h60
  text "Top Layer - Bottom Layer" at 9999.18,2380 h60
  text "Pad" at 11498.73,2380 h60
  text "Rounded" at 12088.58,2380 h60
  text "(Mixed)" at 12834.38,2380 h60
  text "-" at 15163.66,2380 h60
  text "-" at 16263.34,2380 h60
  text "2" at 7010,2230 h60
  text "78.74mil (2.000mm)" at 7609.84,2230 h60
  text "PTH" at 8759.5,2230 h60
  text "Round" at 9265.38,2230 h60
  text "Top Layer - Bottom Layer" at 9999.18,2230 h60
  text "Pad" at 11498.73,2230 h60
  text "Rounded" at 12088.58,2230 h60
  text "c400h200" at 12834.38,2230 h60
  text "-" at 15163.66,2230 h60
  text "-" at 16263.34,2230 h60
  text "H" at 6475.03,2220.01 h66.67
  text "3" at 7010,2080 h60
  text "86.61mil (2.200mm)" at 7609.84,2080 h60
  text "PTH" at 8759.5,2080 h60
  text "Round" at 9265.38,2080 h60
  text "Top Layer - Bottom Layer" at 9999.18,2080 h60
  text "Pad" at 11498.73,2080 h60
  text "Rounded" at 12088.58,2080 h60
  text "(Mixed)" at 12834.38,2080 h60
  text "-" at 15163.66,2080 h60
  text "-" at 16263.34,2080 h60
  text "I" at 6486.14,2070.01 h66.67
  text "2" at 7010,1930 h60
  text "90.55mil (2.300mm)" at 7609.84,1930 h60
  text "PTH" at 8759.5,1930 h60
  text "Round" at 9265.38,1930 h60
  text "Top Layer - Bottom Layer" at 9999.18,1930 h60
  text "Pad" at 11498.73,1930 h60
  text "Rounded" at 12088.58,1930 h60
  text "c380h230m385mx385p0" at 12834.38,1930 h60
  text "-" at 15163.66,1930 h60
  text "-" at 16263.34,1930 h60
  text "2" at 7010,1780 h60
  text "145.67mil (3.700mm)" at 7609.84,1780 h60
  text "PTH" at 8759.5,1780 h60
  text "Round" at 9265.38,1780 h60
  text "Top Layer - Bottom Layer" at 9999.18,1780 h60
  text "Pad" at 11498.73,1780 h60
  text "Rounded" at 12088.58,1780 h60
  text "c600h370" at 12834.38,1780 h60
  text "-" at 15163.66,1780 h60
  text "-" at 16263.34,1780 h60
  text "893 Total" at 7010,1630 h60
  text "Slot definitions :" at 6504.12,1485.03 h60
  text "Routed Path Length" at 7536.81,1485.03 h60
  text "= Calculated from tool start centre position to tool end centre position." at 8639.48,1485.03 h60
  text "Hole Length" at 7536.81,1385.05 h60
  text "= Routed Path Length + Tool Size = Slot length as defined in the PCB layout" at 8229.61,1385.05 h60

## Dimensions
0,3937.01 to 5905.51,0 on Dimensions
0,3937.01 to 5905.51,3937.01 on Dimensions

## Text inside footprints (layer, text, board x,y; h text height)
D1: Top Overlay "+" at 1470.71,2096 h52.3 r90; Top Overlay "-" at 1453.29,1489 h52.3 r90
T1: Top Overlay "1" at 1035,2300 h39.37
T2: Top Overlay "1" at 900,1095 h39.37